# Altium PCB 2025_İDA_PCB_KARTI.PcbDoc
Units mil, origin at the board's own origin, x right, y up, seen from the top; angles counter-clockwise.
Board outline 3938.3 x 3938.3 mil, 4 copper layers (Signal_1, Power, Ground, Signal_2), stack 61.58 mil thick; 47 components, 40 nets, 228 pads, 67 vias.
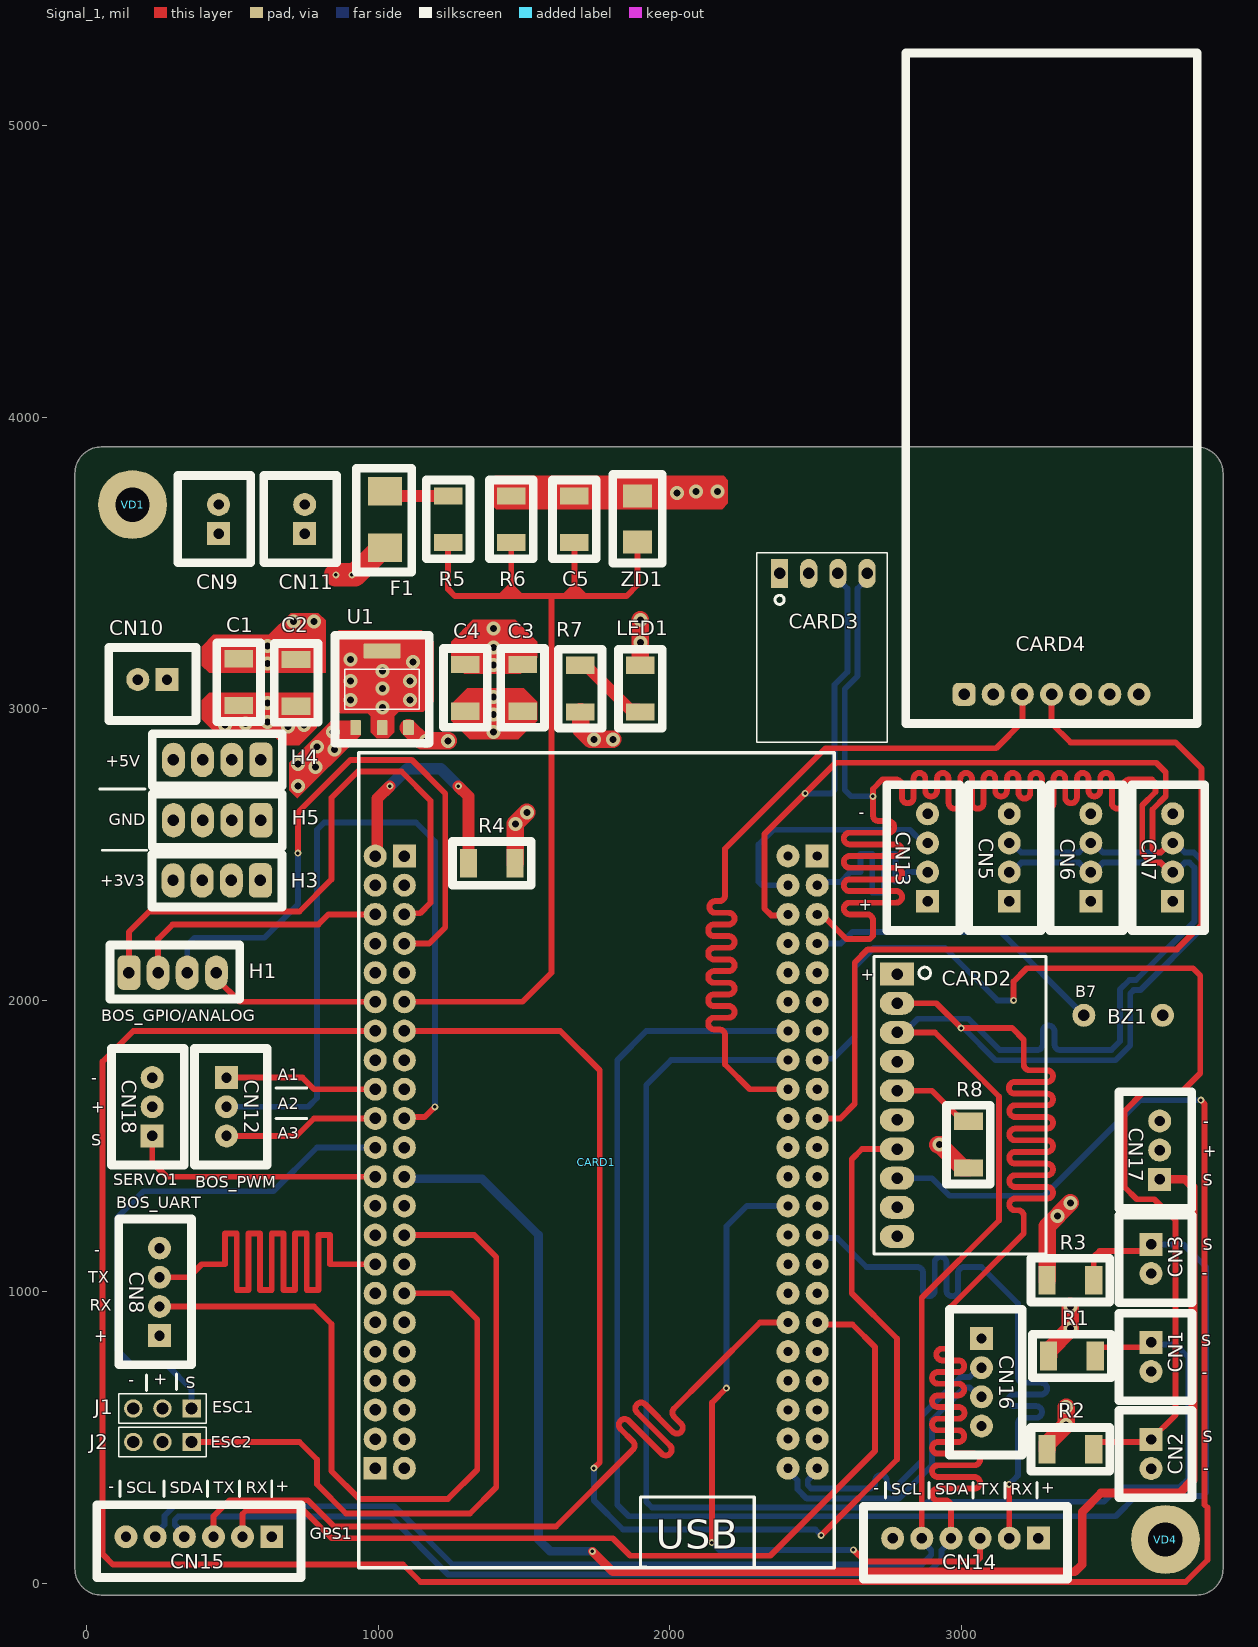
[diagram p0: Signal_1 view]
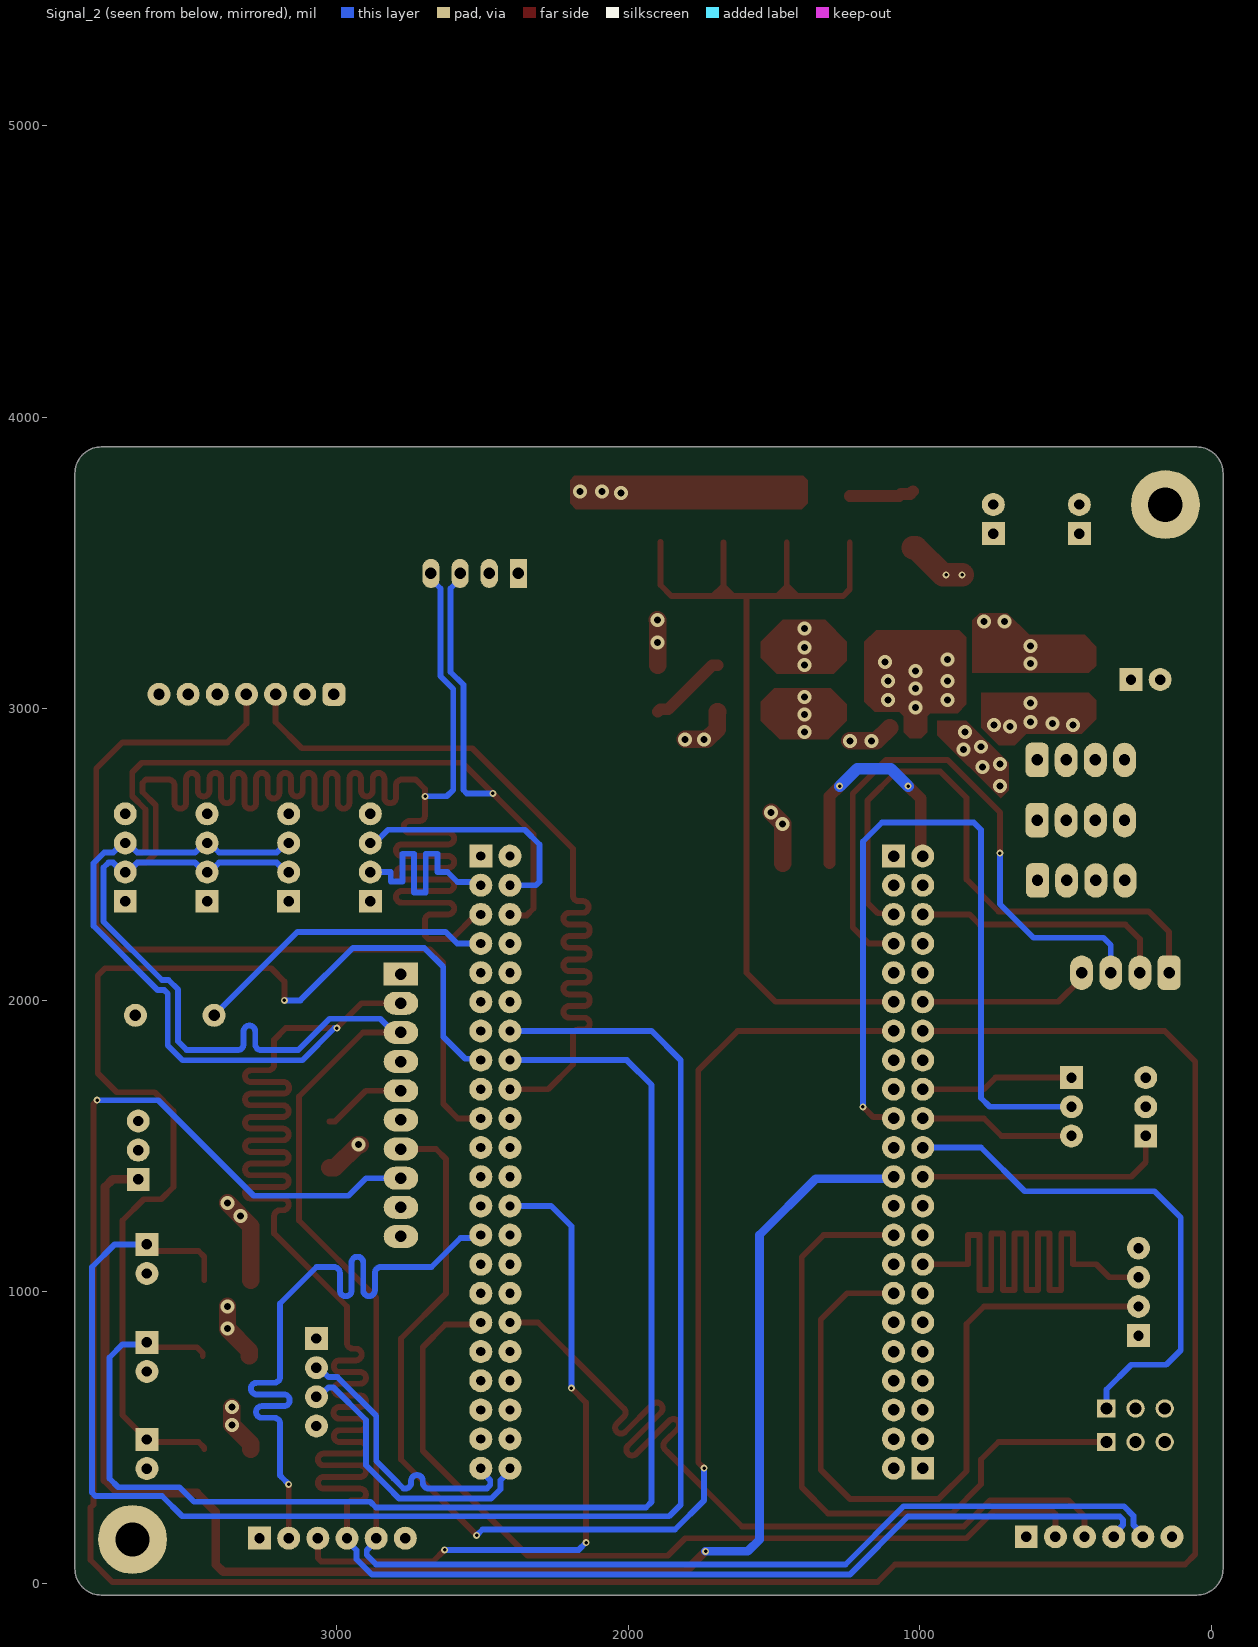
[diagram p1: Signal_2 view, seen from below]
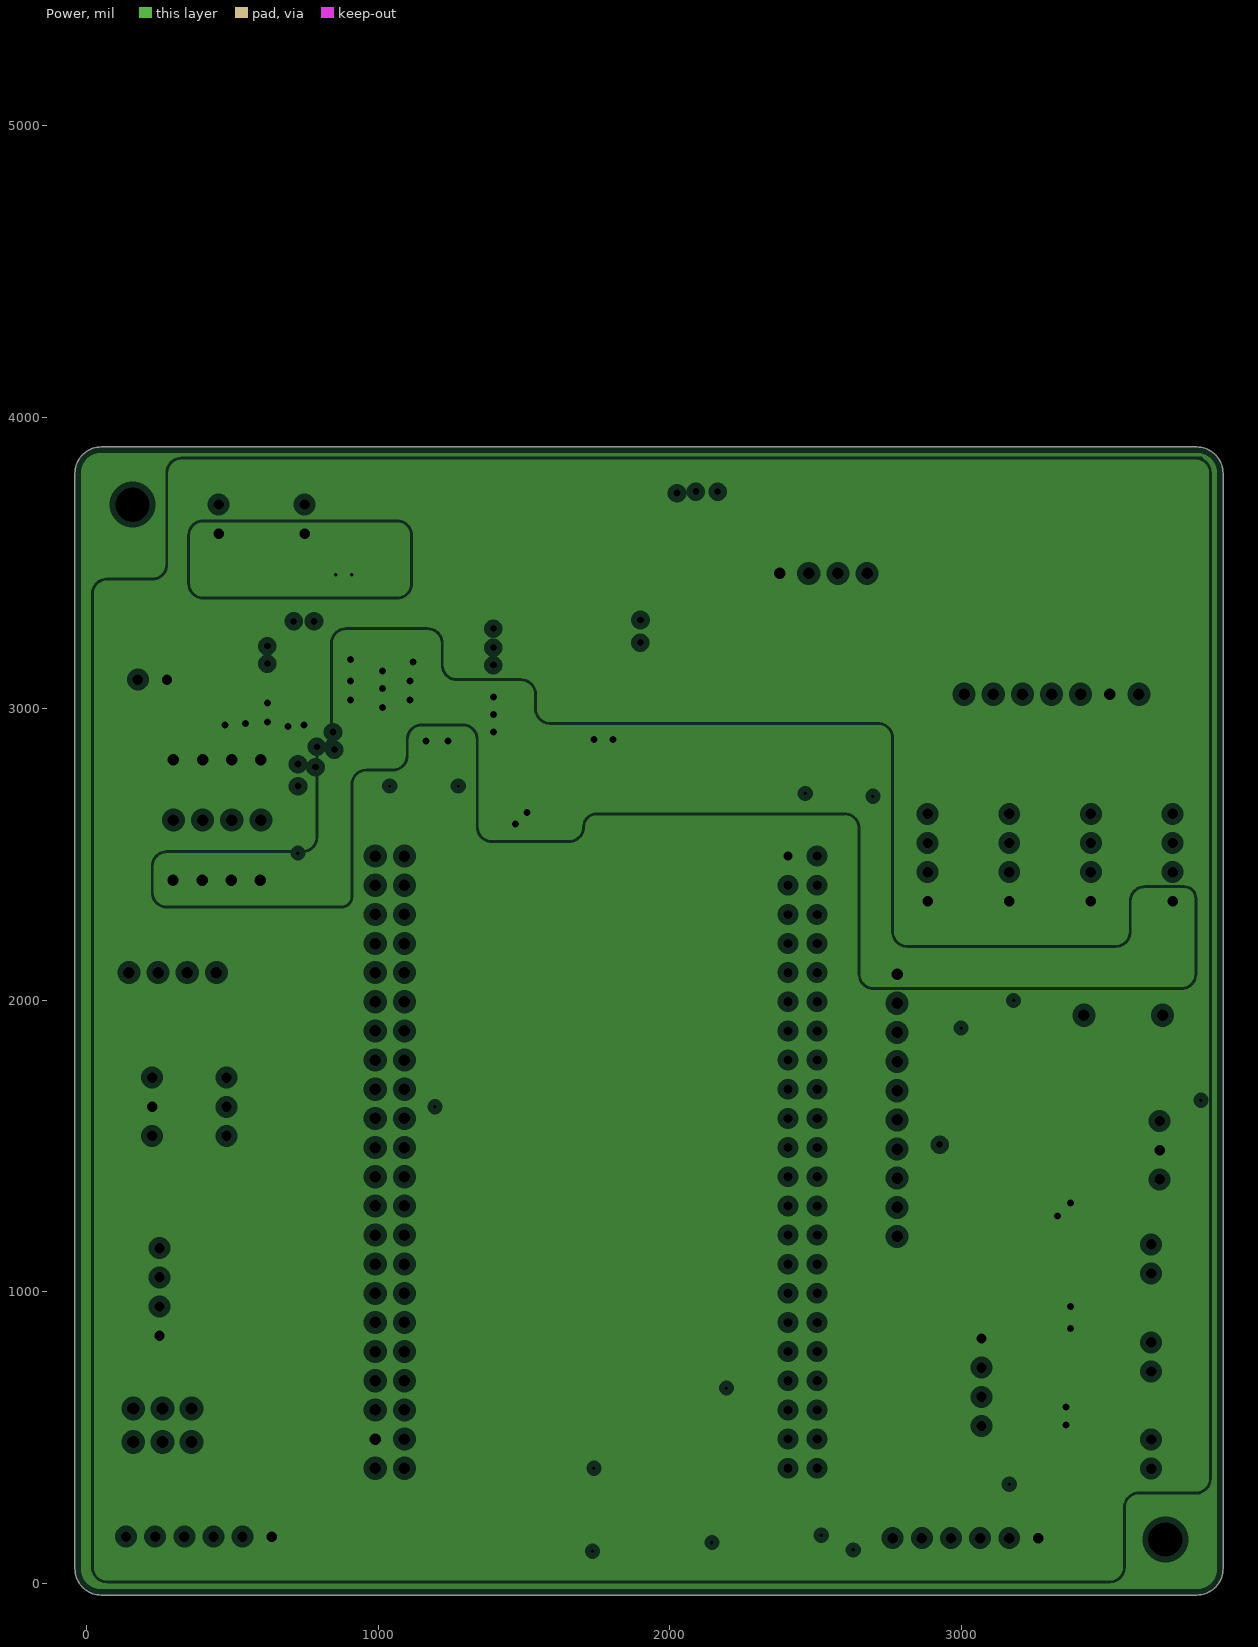
[diagram p2: Power, clearances drawn from the general rule]
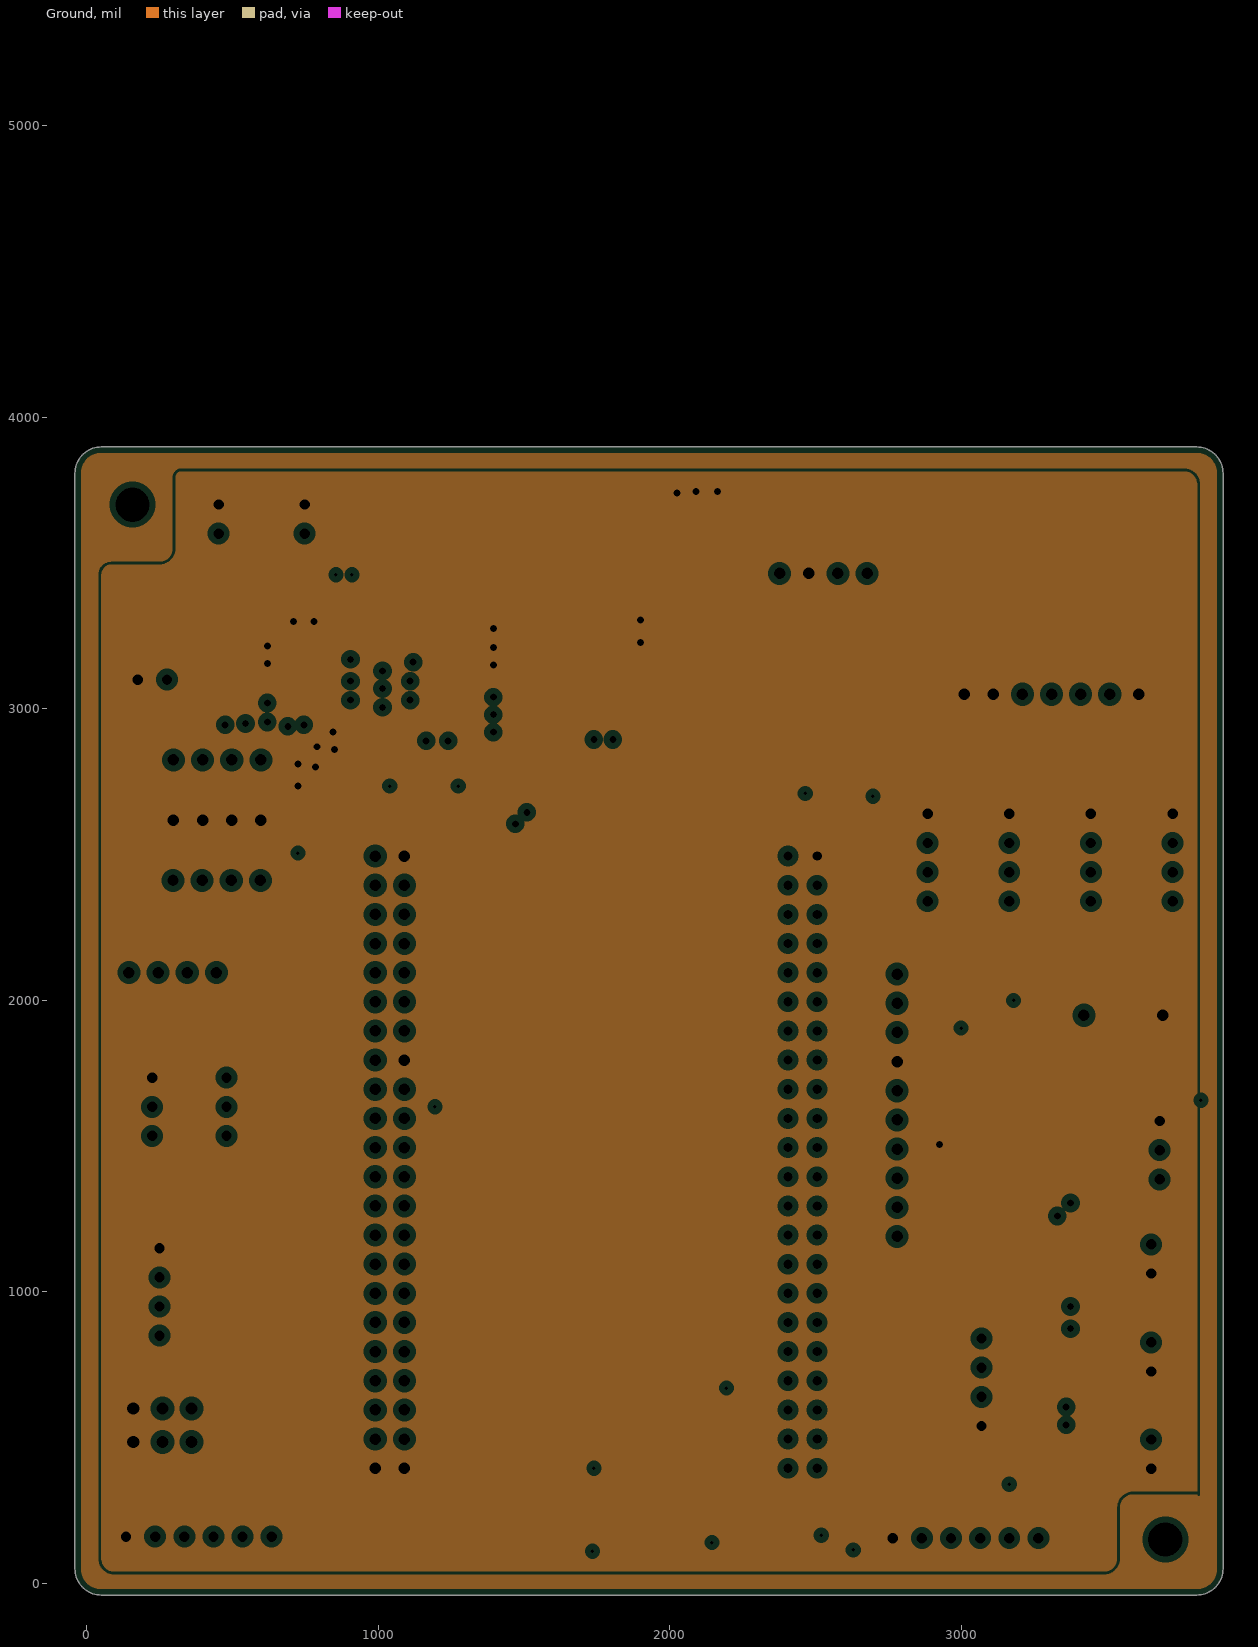
[diagram p3: Ground, clearances drawn from the general rule]
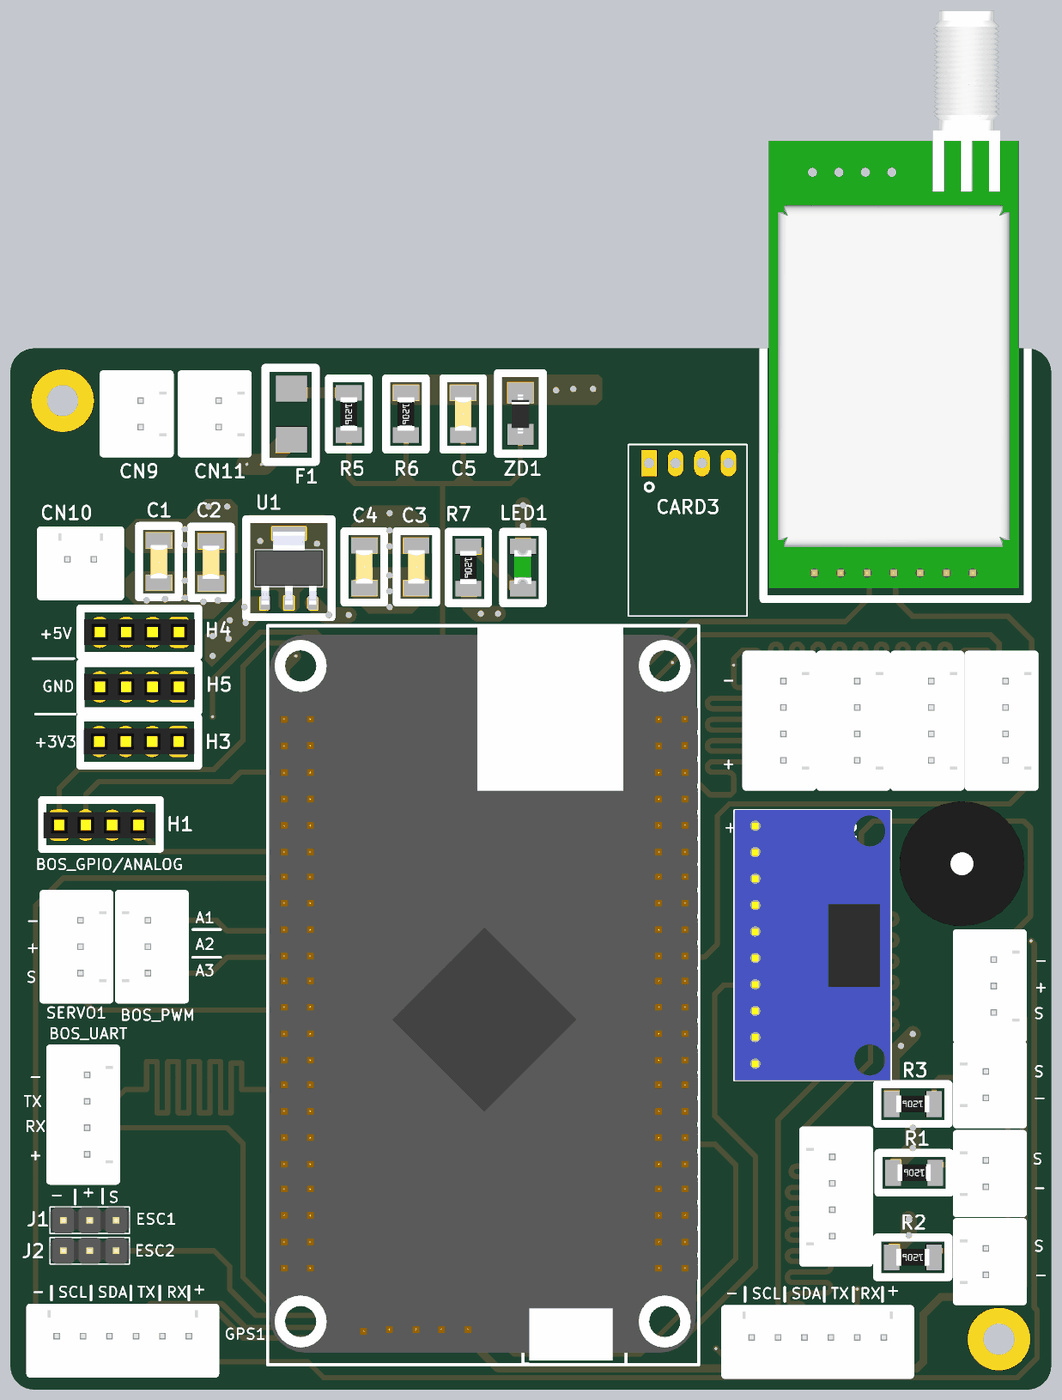
[diagram p4: 3D render of the assembled board from above, using the file's embedded part models]

## Layer stack, top to bottom
Top Solder: solder mask 0.4, Solder Resist, Dk 3.5
Signal_1: signal copper 1.38
Dielectric 2: prepreg 3.91, PP-006, Dk 4.1
Power: plane copper 0.6, net +5VDC
Dielectric 1: dielectric 49.8, FR-4, Dk 4.8
Ground: plane copper 0.6, net GND
Dielectric 3: prepreg 3.91, PP-006, Dk 4.1
Signal_2: signal copper 1.38
Bottom Solder: solder mask 0.4, Solder Resist, Dk 3.5

## Board outline
50,-40.01 cw(c50,50) -40.01,50 -40.01,3808.27 cw(c50,3808.27) 50,3898.28 3808.27,3898.28 cw(c3808.27,3808.27) 3898.28,3808.27 3898.28,50 cw(c3808.27,50) 3808.27,-40.01

## Design rules (kind name [scope] priority, off if disabled: settings)
AssemblyTestpoint [All] p1: testpointundercomponent=TRUE minsize=40 maxsize=300 preferedsize=60 minholesize=0 maxholesize=40 preferedholesize=32 testpointgrid=1 usegrid=TRUE gridtolerance=0.01 allowsidetop=TRUE allowsidebottom=TRUE
Clearance [All] p1: gap=10 ignorepadtopadclearanceinfootprint=FALSE
ComponentClearance [All] p1: gap=10 collisioncheckmode=3 verticalgap=10 showdistances=FALSE donotcheckwithout3dbody=TRUE
DiffPairsRouting [All] p1: maxlimit=20 minlimit=15 mostfreqgap=15 toplayer_minwidth=20 toplayer_maxwidth=30 toplayer_prefwidth=20 bottomlayer_minwidth=20 bottomlayer_maxwidth=30 bottomlayer_prefwidth=20 maxuncoupledlength=500
HoleSize [All] p1: absolutevalues=TRUE maxlimit=300 minlimit=1 maxpercent=80.000 minpercent=20.000
MatchedLengths [All] p1: tolerance=1000 checknetsindiffpair=TRUE checkdiffpairvsdiffpair=FALSE checkxsignals=FALSE checkothers=FALSE usedelayunits=TRUE delaytolerance=1.000000
PlaneClearance [All] p1: clearance=20
PlaneConnect [All] p1: planeconnectstyle=Direct reliefexpansion=20 reliefentries=4 reliefconductorwidth=10 reliefairgap=10
PolygonConnect [All] p1: connectstyle=Direct reliefconductorwidth=10 reliefentries=4 polygonreliefangle="90 Angle" airgapwidth=10
RoutingVias [All] p1: holewidth=12 width=24 viastyle="Through Hole" minholewidth=12 minwidth=24 maxholewidth=200 maxwidth=300
SilkToSolderMaskClearance [IsPad] p1: minsilkscreentomaskgap=6 clearancetoexposedcopper=FALSE
SolderMaskExpansion [All] p1: expansion=4 istentingtop=FALSE
Width [All] p1: maxlimit=100 minlimit=10 preferedwidth=10 minimp=50.000000 maximp=50.000000 favimp=50.000000
23 further rules are at their usual default settings.

## Classes and differential pairs
net class DIFF_BOS_UART: BOS_UART_N BOS_UART_P
net class DIFF_IMU: I2C_N I2C_P
net class DIFF_LORA: LORA_N LORA_P
net class DIFF_KUMANDA: KUMANDA_N KUMANDA_P
net class DIFF_GPS_2: GPS_2_N GPS_2_P
net class DIFF_GPS_1: GPS_1_N GPS_1_P
net class DIFF_GORUNTU: GORUNTU_N GORUNTU_P
component class STM32_Karti_Ve_Bağlantilari: CARD1 CN1 CN2 CN3 CN5 CN6 CN7 CN8 CN12 H1 R1 R2 R3 R4 VD1 VD4
component class Sensorler: CARD2 CARD3 CN14 CN15 CN16 R8
component class Kontrol_Devreleri: BZ1 CN17 CN18 J1 J2
component class Haberlesme: CARD4 CN13
component class Guc_Devreleri: C1 C2 C3 C4 C5 CN9 CN10 CN11 F1 H3 H4 H5 LED1 R5 R6 R7 U1 ZD1
differential pair BOS_UART: +BOS_UART_P -BOS_UART_N
differential pair I2C: +I2C_P -I2C_N
differential pair LORA: +LORA_P -LORA_N
differential pair KUMANDA: +KUMANDA_P -KUMANDA_N
differential pair GPS_2: +GPS_2_P -GPS_2_N
differential pair GPS_1: +GPS_1_P -GPS_1_N
differential pair GORUNTU: +GORUNTU_P -GORUNTU_N

## Components (designator, comment, footprint, x,y, rotation, side; value= is the part's Value field where it differs from the comment)
BZ1 "5V buzzer" "5v buzer" 3480.94,1948.82 r0 top
C1 "10uF" 1206_CAP 521.65,3171.81 r270 top
C2 "1uF" 1206_CAP 718.5,3169.29 r270 top
C3 "1uF" 1206_CAP 1496.06,3152.13 r270 top
C4 "10uF" 1206_CAP 1299.21,3152.13 r270 top
C5 "1uF" 1206_CAP 1673.23,3730.31 r270 top
CARD1 "STM32H723VGT6" STM32H723VGT6_GELISTIRME_KARTI 990,2495 r0 top locked
CARD2 "GY-Bno085" Bno085_Kartı 2780.79,2090 r270 top
CARD3 "AHT10_Karti" AHT10_Karti_PCB 2377.17,3464.57 r180 top
CARD4 "LORA_e22" "LORA e22" 3010,3050 r90 top
CN1 "Güvenlik Anahtarı" 2_Pin_JST_Male 3651.57,826.77 r270 top
CN2 "Güvenlik Anahtarı" 2_Pin_JST_Male 3651.57,493.7 r270 top
CN3 "Güvenlik Anahtarı" 2_Pin_JST_Male 3651.57,1162.99 r270 top
CN5 "I2C_1" 4_Pin_JST_Male 3165,2340 r90 top
CN6 "I2C_2" 4_Pin_JST_Male 3445,2340 r90 top
CN7 "I2C_3" 4_Pin_JST_Male 3725.79,2340 r90 top
CN8 "UART_7" 4_Pin_JST_Male 250,850 r90 top
CN9 "Batarya Girişi" 2_Pin_JST_Male 452.76,3600.79 r90 top
CN10 "5V Girişi" 2_Pin_JST_Male 275.59,3100.39 r180 top
CN11 "Batarya Girişi" 2_Pin_JST_Male 748.03,3600.79 r90 top
CN12 "PWM" 3_Pin_JST_Male 480,1735 r270 top
CN13 "4_Pin_JST_Male" 4_Pin_JST_Male 2885,2340 r90 top
CN14 "GPS_1" 6_Pin_JST_Male 3265,155 r180 top
CN15 "GPS_2" 6_Pin_JST_Male 635,160 r180 top
CN16 "4_Pin_JST_Male" 4_Pin_JST_Male 3070,840 r270 top
CN17 "3_Pin_JST_Male" 3_Pin_JST_Male 3681.1,1386.22 r90 top
CN18 "3_Pin_JST_Male" 3_Pin_JST_Male 225,1535 r90 top
F1 "500mA Sigorta" 1808_Sigorta 1023.62,3553.15 r90 top
H1 "GPIO/ANALOG" 4_pin_header_2.54mm_FEMALE 145,2095 r0 top
H3 "3.3V Dağıtım" 4_pin_header_2.54mm_FEMALE 596.34,2411.42 r180 top
H4 "5V Dağıtım" 4_pin_header_2.54mm_FEMALE 597.91,2824.8 r180 top
H5 "GND Dağıtım" 4_pin_header_2.54mm_FEMALE 597.91,2618.11 r180 top
J1 "ESC_1" HARWIN_M20-9990345 260,600 r180 top
J2 "ESC_2" HARWIN_M20-9990345 260,485 r180 top
LED1 "Yeşil" 1206_LED 1899.61,2989.61 r90 top
R1 "10K" 1206_RES 3460,780 r180 top
R2 "10K" 1206_RES 3455,460 r180 top
R3 "10K" 1206_RES 3455,1040 r180 top
R4 "0R" 1206_RES 1310,2470 r0 top
R5 "1M" 1206_RES 1240.16,3730.31 r270 top
R6 "200K" 1206_RES 1456.69,3730.31 r270 top
R7 "33R" 1206_RES 1692.91,3149.61 r270 top
R8 "0R" 1206_RES 3025,1425 r90 top
U1 "LDO_voltage_reg_SMD" SOT229P700X180-4N 1013.78,3067.13 r90 top value=3.3V_DC
VD1 "M3" Vida_Deliği#1 157.48,3700.79 r0 top
VD4 "M3" Vida_Deliği#2 3700.79,157.48 r0 top
ZD1 "5V1 Zener" SOD-123 1889.76,3730.31 r270 top

## Footprints (in the part's own frame and the unit in brackets; to place one, negate y for a bottom-side part, rotate by r counter-clockwise, add the part's x,y. Pads: shape width x height; smd on the part's side, far side on the other; paste and mask are expansions set on the pad)
2_Pin_JST_Male [mm]
  rect 2x2 hole 0.9 mask+0.05: 1(0,0)
  round 2 hole 0.9 mask+0.05: 2(2.54,0)
  silkscreen extent -2.54,-2.79 5.08,3.56, body extent -2.34,-2.49 4.88,3.35, height 7.21
3_Pin_JST_Male [mm]
  rect 2x2 hole 0.9 mask+0.05: 1(0,0)
  round 2 hole 0.9 mask+0.05: 2(2.54,0) 3(5.08,0)
  silkscreen extent -2.54,-2.79 7.62,3.56, body extent -2.34,-2.49 7.42,3.35, height 7.21
4_pin_header_2.54mm_FEMALE [mm]
  rrect50% 2x3 hole 1 mask+0.05: 1(0,0)
  oval 2x3 hole 1 mask+0.05: 2(2.54,0) 3(5.08,0) 4(7.62,0)
  silkscreen extent -1.65,-2.29 9.65,2.41, body extent -1.52,-1.25 9.14,1.25, height 5
4_Pin_JST_Male [mm]
  rect 2x2 hole 0.9 mask+0.05: 1(0,0)
  round 2 hole 0.9 mask+0.05: 2(2.54,0) 3(5.08,0) 4(7.62,0)
  silkscreen extent -2.54,-2.79 10.16,3.56, body extent -2.34,-2.49 9.96,3.35, height 7.21
"5v buzer" [mm]
  round 2 hole 1 mask+0.05: 1(-1.524,0) 2(5.334,0)
  body extent -3.97,-6 8.03,6, height 10
6_Pin_JST_Male [mm]
  rect 2x2 hole 0.9 mask+0.05: 1(0,0)
  round 2 hole 0.9 mask+0.05: 2(2.54,0) 3(5.08,0) 4(7.62,0) 5(10.16,0) 6(12.7,0)
  silkscreen extent -2.54,-2.79 15.24,3.56, body extent -2.34,-2.54 15.04,3.3, height 7.21
1206_CAP [mm]
  rect 1.5x2.5 smd mask+0.05: 1(0,0) 2(4.064,0)
  silkscreen extent -1.4,-1.91 5.46,1.91, body extent 0.43,-0.8 3.63,0.8, height 1.8
1206_LED [mm]
  rect 1.5x2.5 smd mask+0.05: 1(0,0) 2(4.064,0)
  silkscreen extent -1.4,-1.91 5.46,1.91, body extent 0.44,-0.8 3.71,0.85, height 0.9
1206_RES [mm]
  rect 1.5x2.5 smd mask+0.05: 1(0,0) 2(4.064,0)
  silkscreen extent -1.4,-1.91 5.46,1.91, body extent 0.43,-0.8 3.63,0.8, height 0.62
1808_Sigorta [mm]
  rect 2.5x3 smd mask+0.05: 1(0,0) 2(4.9,0)
  silkscreen extent -2.12,-2.32 6.91,2.5, body extent -0.64,-1.27 5.46,1.27, height 2.58
AHT10_Karti_PCB [mm]
  rect 1.5x2.54 hole 1 mask+0.05: 1(0,0)
  oval 1.5x2.54 hole 1 mask+0.05: 2(-2.54,0) 3(-5.08,0) 4(-7.62,0)
  silkscreen extent -9.4,-1.79 2,14.7, body extent -9.1,-1.17 1.7,14.6, height 5.1
Bno085_Kartı [mm]
  rect 2x3 hole 1: 1(0,-0.02)
  oval 2x3 hole 1: 2(2.54,-0.02) 3(5.08,-0.02) 4(7.62,-0.02) 5(10.16,-0.02) 6(12.7,-0.02) 7(15.24,-0.02) 8(17.78,-0.02) 9(20.32,-0.02) 10(22.86,-0.02)
  silkscreen extent -1.52,-2.03 24.38,12.95, body extent -1.57,-2.05 24.43,12.95, height 7.38
HARWIN_M20-9990345 [mm]
  rect 1.605x1.605 hole 1.07: 1(-2.54,0)
  round 1.605 hole 1.07: 2(0,0) 3(2.54,0)
  silkscreen extent -3.81,-1.27 3.81,1.27, body extent -3.81,-1.27 3.81,1.27, height 7.37
"LORA e22" [mm]
  rrect50% 2x2 hole 1 mask+0.05: 1(0,0)
  round 2 hole 1 mask+0.05: 2(0,-2.54) 3(0,-5.08) 4(0,-7.62) 5(0,-10.16) 6(0,-12.7) 7(0,-15.24)
  silkscreen extent -2.54,-20.32 55.88,5.08, body extent -1.52,-19.43 53.98,4.57, height 8.1
SOD-123 [mm]
  rect 2x2.5 smd mask+0.05: 1(0,0) 2(4,0)
  silkscreen extent -1.9,-2.15 5.85,2.17, body extent 0.16,-0.85 3.91,0.85, height 1.2
SOT229P700X180-4N [mm]
  rrect15% 1.31x0.93 smd: 1(-3.345,2.29) 2(-3.345,0) 3(-3.345,-2.29)
  rrect15% 1.31x3.24 smd: 2(3.345,0)
  silkscreen extent -4.7,-4.1 4.7,4.1, body extent -3.5,-3.25 3.5,3.25, height 1.8
STM32H723VGT6_GELISTIRME_KARTI [mm]
  rect 2x2 hole 0.8 mask+0.05: 1(38.508,0)
  round 2 hole 0.8 mask+0.05: 2(35.968,0) 3(38.508,-2.54) 4(35.968,-2.54) 5(38.508,-5.08) 6(35.968,-5.08) 7(38.508,-7.62) 8(35.968,-7.62) 9(38.508,-10.16) 10(35.968,-10.16) 11(38.508,-12.7) 12(35.968,-12.7) 13(38.508,-15.24) 14(35.968,-15.24) 15(38.508,-17.78) 16(35.968,-17.78) 17(38.508,-20.32) 18(35.968,-20.32) 19(38.508,-22.86) 20(35.968,-22.86) 21(38.508,-25.4) 22(35.968,-25.4) 23(38.508,-27.94) 24(35.968,-27.94) 25(38.508,-30.48) 26(35.968,-30.48) 27(38.508,-33.02) 28(35.968,-33.02) 29(38.508,-35.56) 30(35.968,-35.56) 31(38.508,-38.1) 32(35.968,-38.1) 33(38.508,-40.64) 34(35.968,-40.64) 35(38.508,-43.18) 36(35.968,-43.18) 37(38.508,-45.72) 38(35.968,-45.72) 39(38.508,-48.26) 40(35.968,-48.26) 41(38.508,-50.8) 42(35.968,-50.8) 43(38.508,-53.34) 44(35.968,-53.34)
  rect 2x2 hole 1 mask+0.05: 45(2.54,0) 88(0,-53.34)
  round 2 hole 1 mask+0.05: 46(0,0) 47(2.54,-2.54) 48(0,-2.54) 49(2.54,-5.08) 50(0,-5.08) 51(2.54,-7.62) 52(0,-7.62) 53(2.54,-10.16) 54(0,-10.16) 55(2.54,-12.7) 56(0,-12.7) 57(2.54,-15.24) 58(0,-15.24) 59(2.54,-17.78) 60(0,-17.78) 61(2.54,-20.32) 62(0,-20.32) 63(2.54,-22.86) 64(0,-22.86) 65(2.54,-25.4) 66(0,-25.4) 67(2.54,-27.94) 68(0,-27.94) 69(2.54,-30.48) 70(0,-30.48) 71(2.54,-33.02) 72(0,-33.02) 73(2.54,-35.56) 74(0,-35.56) 75(2.54,-38.1) 76(0,-38.1) 77(2.54,-40.64) 78(0,-40.64) 79(2.54,-43.18) 80(0,-43.18) 81(2.54,-45.72) 82(0,-45.72) 83(2.54,-48.26) 84(0,-48.26) 85(2.54,-50.8) 86(0,-50.8) 87(2.54,-53.34)
  silkscreen extent -1.45,-62 40,9, body extent -1.27,-61.61 39.95,9.14, height 6.34
Vida_Deliği#1 [mm]
  round 6 hole 3 mask+0.05: 1(0,0)
Vida_Deliği#2 [mm]
  round 6 hole 3 mask+0.05: 1(0,-0.178)

## Part data
BZ1: library part Buzzer
C1 C2 C3 C4 C5: library part 1206_CAP
CARD1: library part STM32H723VGT6_gelistirme_karti_sematik
CARD2: "GY-BNO080 BNO085 9-Axis High Precision Acceleration and Gyro Sensor", ComponentLink1Description="Ürün Linki", ComponentLink1URL=https://www.motorobit.com/gy-bno080-bno085-9-eksen-yuksek-hassasiyetli-ivme-ve-gyro-sensoru
CARD3: "Temperature and humidity sensor Fully calibrated / • Digital output, I2C interface / • Excellent long-term stability / • SMD package reflow solderable / • Fast response and strong anti-interference ability", ComponentLink1Description="Product Datasheet", ComponentLink1URL=https://robu.in/wp-content/uploads/2021/01/AHT10.pdf, ComponentLink2Description="Product Datasheet 2", ComponentLink2URL=https://esphome.io/components/sensor/aht10.html
CN1 CN2 CN3 CN9 CN10 CN11: library part 2_Pin_JST_Male
CN5 CN6 CN7 CN8: library part 4_Pin_JST_Male
CN12: library part 3_Pin_JST_Male
CN14 CN15: library part 6_Pin_JST_Male
F1: library part 1808_Sigorta
H1 H3 H4 H5: library part 4_pin_header_female
J1 J2: library part M20-9990345, "2.54mm (0.1) Pitch SIL Vertical Throughboard Pin Header, 6.1mm mating pin height, gold (hi-temp mould), 3 contacts", Package=None, Check_prices=https://www.snapeda.com/parts/M20-9990345/Harwin+Inc./view-part/?ref=eda, MF=Harwin, MP=M20-9990345, SnapEDA_Link=https://www.snapeda.com/parts/M20-9990345/Harwin+Inc./view-part/?ref=snap
LED1: library part 1206_LED
R1 R2 R3 R4 R5 R6 R7 R8: library part 1206_RES
U1: library part AMS1117-3.3, "Sot223/Pkg 1-Amp 3.3-Volt Low Drop Out Voltage Regulatator", LCSC Part Number=C20611856, Package="SOT-223 Seeed Technology", Availability="Not in stock", Check_prices=https://www.snapeda.com/parts/AMS1117-3.3/Advanced+Monolithic+Systems/view-part/?ref=eda, MF="Advanced Monolithic Systems", MP=AMS1117-3.3, Price=None, SnapEDA_Link=https://www.snapeda.com/parts/AMS1117-3.3/Advanced+Monolithic+Systems/view-part/?ref=snap
VD1 VD4: library part Vida_Deliği
ZD1: library part SMD_Zener_Diyot

## Via types
v1: diameter 48, hole 24, Signal_1 to Signal_2, tented both sides, 49 vias
v2: diameter 24, hole 12, Signal_1 to Signal_2, tented both sides, 18 vias

## Nets (pads, with @x,y where several pads share a name; then routed paths per layer and width w, separated by ;. In a path a pad name is that pad's centre, name@x,y a point inside that pad or via, vN(x,y) a via of type N, cw(c..) or ccw(c..) an arc to the next point about the centre after c; other vN are vias at no path point)
+3V3DC: C3.2 C4.2 CARD2.1 CN7.1 H3.1 H3.2 H3.3 H3.4 R4.2 R7.2 U1.2 | length 377.4
  Signal_1 w60: R4.2 1470.47,2470.47 v1(1470.47,2605.47) v1(1510,2645) ; R7.2 1694.53,2989.61 1695,2989.13 1695,2930.15 1730.15,2895 v1(1805,2895)
  other v1: 1740,2895 1395,2920 1395,2980 1015,3005 905,3030 1110,3030 1395,3040 1015,3070 905,3095 1110,3095 1015,3130 1120,3160 905,3170
+5VDC: C1.2 C2.2 CARD1.2 CARD1.86 CARD3.1 CARD4.6 CN5.1 CN6.1 CN8.1 CN10.1 CN13.1 CN14.1 CN15.1 CN16.1 CN17.2 CN18.2 H4.1 H4.2 H4.3 H4.4 R1.2 R2.2 R3.2 U1.3 | length 826
  Signal_1 w60: U1.3 1149.37,2890 v1(1240,2890) ; R2.2 3295,478.74 v1(3360,543.74) v1(3360,605) ; R3.2 3295,1225 v1(3375,1305) ; R1.2 3300,798.74 v1(3375,873.74) v1(3375,950)
  other v1: 3330,1260 1165,2890 690,2940 475,2945 745,2945 545,2950 620,2955 620,3020
+Vbat: CN9.1 CN11.1 F1.1 | length 207.2
  Signal_1 w80: v2(855,3460) 920.63,3460 1013.78,3553.15 F1.1
  other v2: 910,3460
A1_PWM: CARD1.62 CN12.1 | length 526.6
  Signal_1 w20: CN12.1 740,1735 780,1695 CARD1.62
A2_PWM: CARD1.63 CN12.2 | length 2716.3
  Signal_1 w20: CARD1.63 1094.37,1599.37 1159.37,1599.37 v2(1195,1635)
  Signal_2 w20: CN12.2 760,1635 790,1665 790,2585 815,2610 1130,2610 1195,2545 v2(1195,1635)
A3_PWM: CARD1.64 CN12.3 | length 534.9
  Signal_1 w20: CN12.3 720,1535 780,1595 CARD1.64
A5_PWM: CARD1.66 J1.1 | length 1815.3
  Signal_2 w20: J1.1 360,665 275,750 155,750 105,800 105,1255 195,1345 640,1345 790,1495 CARD1.66
A6_PWM: CARD1.67 CN17.1 | length 5244.1
  Signal_1 w30: v2(1735,110) 1805,40 3390,40 3415,65 3415,245 3480,310 3750,310 3795,355 3795,1360 3768.78,1386.22 CN17.1
  Signal_2 w30: CARD1.67 1096.55,1388.45 1356.55,1388.45 1550,1195 1550,150 1590,110 v2(1735,110)
A7_PWM: CARD1.68 CN18.1 | length 875.7
  Signal_1 w20: CN18.1 225,1445 275,1395 CARD1.68
B0_PWM: CARD1.71 J2.1 | length 2369.6
  Signal_1 w20: J2.1 730,485 790,425 790,340 890,240 1315,240 1405,330 1405,1120 1330,1195 CARD1.71
B7_PWM: BZ1.1 CARD1.7 | length 1050
  Signal_2 w20: CARD1.7 2587.15,2195 2627.15,2235 3134.76,2235 BZ1.1
BOS_UART_N: CARD1.74 CN8.3 | length 2506.6
  Signal_1 w20: CN8.3 350,1050 395,1095 465,1095 475,1095 475,1200 515,1200 515,1006.4 555,1006.4 555,1200 595,1200 595,1006.4 635,1006.4 635,1200 675,1200 675,1006.4 715,1006.4 715,1200 755,1200 755,1006.4 795,1006.4 795,1194.58 835,1194.58 835,1095 871.85,1095 CARD1.74
BOS_UART_P: CARD1.75 CN8.2 | length 2502.9
  Signal_1 w20: CN8.2 780,950 840,890 840,385 935,290 1240,290 1340,390 1340,905 1250,995 CARD1.75
C0_ANALOG: C5.2 CARD1.55 R5.2 R6.2 ZD1.2 | length 3171.8
  Signal_1 w20: CARD1.55 1495,1995 1595,2095 1595,3385 1593.31,3386.69 ; R5.2 1240.16,3410.12 1263.59,3386.69 1456.69,3386.69 ; R6.2 1456.69,3386.69 ; C5.2 1673.23,3406.77 1675,3405 ; ZD1.2 1889.76,3424.76 1851.69,3386.69 1675,3386.69 1593.31,3386.69 ; 1456.69,3386.69 1593.31,3386.69
C1_ANALOG: CARD1.56 H1.4 | length 598
  Signal_1 w20: H1.4 445,2075.32 525.32,1995 CARD1.56
C2_INT: CARD1.57 CARD2.7 | length 4670.3
  Signal_1 w20: CARD1.57 1625,1895 1760,1760 1760,415 v2(1740,395) ; v2(2520,165) 2780,425 2780,840 2625,995 2625,1455 2660,1490 CARD2.7
  Signal_2 w20: v2(1740,395) 1740,285 1840,185 2500,185 v2(2520,165)
C3_GPIO: CARD1.58 CARD2.8 | length 9318.7
  Signal_1 w20: CARD1.58 160,1895 55,1790 55,100 90,65 1085,65 1145,5 3770,5 3845,80 3845,260 3835,270 3835,1645 v2(3822.5,1657.5)
  Signal_2 w20: CARD2.8 2900,1390 2960,1330 3285,1330 3612.5,1657.5 v2(3822.5,1657.5)
D3_GPIO: CARD1.16 CN1.1 R1.1 | length 4642.4
  Signal_1 w20: R1.1 3460,790.47 3479.53,810 3634.8,810 CN1.1
  Signal_2 w20: CARD1.16 2005,1795 1920,1710 1920,280 1939.37,260.63 2865.63,260.63 2885,280 3490,280 3540,330 3750,330 3780,360 3780,775 3735,820 3658.35,820 CN1.1
D4_GPIO: CARD1.15 CN2.1 R2.1 | length 3913.6
  Signal_1 w20: v2(3180,2000) 3180,2065 3225,2110 3795,2110 3820,2085 3820,1750 3755,1685 3625,1685 3560,1620 3560,1360 3602.5,1317.5 3662.5,1317.5 3735,1245 3735,577.13 CN2.1 3642.87,485 3474.53,485 3455,465.47 R2.1
  Signal_2 w20: CARD1.15 2510.65,1799.58 2559.58,1799.58 2635,1875 2635,2115 2700,2180 2945,2180 3125,2000 v2(3180,2000)
D5_GPIO: CARD1.14 CN3.1 R3.1 | length 5511.6
  Signal_1 w20: R3.1 3455,1120.47 3474.53,1140 3628.58,1140 CN3.1
  Signal_2 w20: CARD1.14 1920,1895 1820,1795 1820,270 1860,230 3530,230 3600,300 3828.28,300 3840,311.72 3840,1085 3762.01,1162.99 CN3.1
E4_GPIO: CARD1.49 H1.1 | length 2064.8
  Signal_1 w20: H1.1 145,2235 215,2305 730,2305 840,2415 840,2695 930,2785 1080,2785 1180,2685 1180,2335 1144.05,2299.05 1094.05,2299.05 CARD1.49
E5_GPIO: CARD1.50 H1.2 | length 895.2
  Signal_1 w20: H1.2 245,2210 295,2260 795,2260 830,2295 CARD1.50
E6_GPIO: CARD1.51 H1.3 | length 2098
  Signal_1 w20: v2(725,2505) 725,2645 905,2825 1115,2825 1230,2710 1230,2250 1175,2195 CARD1.51
  Signal_2 w20: H1.3 345,2190 370,2215 610,2215 725,2330 v2(725,2505)
GND: BZ1.2 C1.1 C2.1 C3.1 C4.1 C5.1 CARD1.1 CARD1.45 CARD1.59 CARD1.87 CARD1.88 CARD2.4 CARD3.2 CARD4.1 CARD4.2 CARD4.7 CN1.2 CN2.2 CN3.2 CN5.4 CN6.4 CN7.4 CN8.4 CN9.2 CN10.2 CN11.2 CN13.4 CN14.6 CN15.6 CN16.4 CN17.3 CN18.3 H5.1 H5.2 H5.3 H5.4 J1.3 J2.3 LED1.2 R6.1 R8.1 U1.1 ZD1.1 | length 293.7
  Signal_1 w60: LED1.2 1899.61,3304.61 v1(1900,3305) ; v1@2920,1505 v1(2926.26,1505) 3006.26,1425 R8.1
  other v1: 725,2735 785,2800 725,2810 850,2860 790,2870 845,2920 1395,3150 620,3155 1395,3210 620,3215 1899.61,3227.11 1395,3275 710,3300 780,3300 2025,3740 2090,3745 2165,3745
GORUNTU_N: CARD1.44 CN16.3 | length 992.9
  Signal_2 w20: CARD1.44 2406.06,386.41 2438.56,353.91 2438.56,322.85 2470.78,290.63 2785.63,290.63 2829.75,334.75 2900,405 2900,560.15 3012.35,672.5 3028.91,672.5 3061.41,640 CN16.3
GORUNTU_P: CARD1.43 CN16.2 | length 992.9
  Signal_2 w20: CARD1.43 2506.06,386.41 2473.56,353.91 2473.56,337.35 2485.28,325.63 2616.64,325.63 2685,325.63 ccw(c2685,345.63) 2705,345.63 2705,351.79 cw(c2725,351.79) 2745,351.79 2745,345.63 ccw(c2765,345.63) 2765,325.63 2771.13,325.63 2805,359.5 2865,419.5 2865,574.65 2997.85,707.5 3028.91,707.5 3061.41,740 CN16.2
GPS_1_N: CARD1.26 CN14.3 | length 2364.7
  Signal_1 w20: v2(2145,140) 2145,620 v2(2195,670) ; v2(2630,115) 2670,75 3053.28,75 3065,86.72 CN14.3
  Signal_2 w20: v2(2145,140) 2170,115 v2@2628.92,115 ; v2(2195,670) 2195,1225 2265,1295 CARD1.26
GPS_1_P: CARD1.27 CN14.2 | length 2368.8
  Signal_1 w20: CN14.2 v2(3165,340)
  Signal_2 w20: CARD1.27 2516.5,1184.57 2575.43,1184.57 2675,1085 2799.4,1085 2849.41,1085 cw(c2849.41,1065) 2869.41,1065 2869.41,1005 ccw(c2889.41,1005) 2909.41,1005 2909.41,1100.78 cw(c2929.41,1100.78) 2949.41,1100.78 2949.41,1005 ccw(c2969.41,1005) 2989.41,1005 2989.41,1065 cw(c3009.41,1065) 3009.41,1085 3050,1085 3070,1085 3195,960 3195,718.13 3195,708.13 ccw(c3215,708.13) 3215,688.13 3275,688.13 cw(c3275,668.13) 3275,648.13 3181.74,648.13 ccw(c3181.74,628.13) 3181.74,608.13 3257.16,608.13 cw(c3257.16,588.13) 3257.16,568.13 3215,568.13 ccw(c3215,548.13) 3195,548.13 3195,370 3189.67,364.67 v2(3165,340)
GPS_2_N: CARD1.34 CN15.3 | length 3053.3
  Signal_1 w20: CN15.3 435,230 490,285 759.5,285 849.5,195 1610,195 1866.78,451.78 1873.85,458.85 ccw(c1859.71,472.99) 1873.85,487.14 1831.43,529.56 cw(c1845.57,543.7) 1831.43,557.85 cw(c1845.57,543.7) 1859.71,557.85 1972.85,444.71 ccw(c1986.99,458.85) 2001.13,444.71 ccw(c1986.99,458.85) 2001.13,472.99 1887.99,586.13 cw(c1902.14,600.27) 1887.99,614.42 cw(c1902.14,600.27) 1916.28,614.42 2011.06,519.64 ccw(c2025.2,533.78) 2039.34,519.64 ccw(c2025.2,533.78) 2039.34,547.92 2015.27,571.99 cw(c2029.42,586.13) 2015.27,600.27 2125.58,710.58 2310,895 CARD1.34
GPS_2_P: CARD1.33 CN15.2 | length 3055.6
  Signal_1 w20: CN15.2 535,238.28 546.72,250 745,250 840,155 1805,155 1865,95 2345,95 2705,455 2705,810 2627.08,887.92 2513.15,887.92 CARD1.33
I2C_N: CARD1.5 CARD2.3 CARD3.4 CN5.2 CN6.2 CN7.2 CN14.5 CN15.5 | length 13414.7
  Signal_1 w20: CARD1.5 2521.96,2295 2606.96,2210 2685.62,2210 2697.34,2221.72 2697.34,2265 2697.34,2275 ccw(c2677.34,2275) 2677.34,2295 2617.34,2295 cw(c2617.34,2315) 2617.34,2335 2777.34,2335 ccw(c2777.34,2355) 2777.34,2375 2617.34,2375 cw(c2617.34,2395) 2617.34,2415 2777.34,2415 ccw(c2777.34,2435) 2777.34,2455 2617.34,2455 cw(c2617.34,2475) 2617.34,2495 2777.34,2495 ccw(c2777.34,2515) 2777.34,2535 2617.34,2535 cw(c2617.34,2555) 2617.34,2575 2750.66,2575 ccw(c2750.66,2595) 2750.66,2615 2717.34,2615 cw(c2717.34,2635) 2697.34,2635 v2(2697.34,2700) 2697.34,2725 2726.96,2754.63 2729.67,2757.34 2776.96,2757.34 cw(c2776.96,2737.34) 2796.96,2737.34 2796.96,2695.92 ccw(c2816.96,2695.92) 2836.96,2695.92 2836.96,2760 cw(c2856.96,2760) 2876.96,2760 2876.96,2719.37 ccw(c2896.96,2719.37) 2916.96,2719.37 2916.96,2760 cw(c2936.96,2760) 2956.96,2760 2956.96,2677.34 ccw(c2976.96,2677.34) 2996.96,2677.34 2996.96,2760 cw(c3016.96,2760) 3036.96,2760 3036.96,2677.34 ccw(c3056.96,2677.34) 3076.96,2677.34 3076.96,2760 cw(c3096.96,2760) 3116.96,2760 3116.96,2719.37 ccw(c3136.96,2719.37) 3156.96,2719.37 3156.96,2760 cw(c3176.96,2760) 3196.96,2760 3196.96,2712 ccw(c3216.96,2712) 3236.96,2712 3236.96,2760 cw(c3256.96,2760) 3276.96,2760 3276.96,2677.34 ccw(c3296.96,2677.34) 3316.96,2677.34 3316.96,2760 cw(c3336.96,2760) 3356.96,2760 3356.96,2695.92 ccw(c3376.96,2695.92) 3396.96,2695.92 3396.96,2760 cw(c3416.96,2760) 3436.96,2760 3436.96,2719.37 ccw(c3456.96,2719.37) 3476.96,2719.37 3476.96,2760 cw(c3496.96,2760) 3516.96,2760 3516.96,2677.34 ccw(c3536.96,2677.34) 3556.96,2677.34 3556.96,2737.34 cw(c3576.96,2737.34) 3576.96,2757.34 3615,2757.34 3655,2757.34 3666.72,2745.62 3666.72,2714.39 3621.42,2669.09 3621.42,2504.72 3653.64,2472.5 3684.7,2472.5 3717.2,2440 CN7.2 ; CARD2.3 2910,1890 3130,1670 3130,1245 2865,980 CN14.5
  Signal_2 w20: CN15.5 235,168.59 267.5,201.09 267.5,232.15 299.72,264.37 1055.63,264.37 1255,65 2865.15,65 2897.5,97.35 2897.5,113.91 2865,146.41 CN14.5 ; CARD3.4 2677.17,3445.35 2644.67,3412.85 2644.67,3112.25 2600.74,3068.32 2600.74,2721.72 2622.46,2700 v2(2697.34,2700) ; CARD2.3 2803.79,1890 2850.79,1937 3025.25,1937 3132.5,1829.75 3250,1829.75 3260,1829.75 ccw(c3260,1849.75) 3280,1849.75 3280,1893.4 cw(c3300,1893.4) 3320,1893.4 3320,1849.75 ccw(c3340,1849.75) 3340,1829.75 3390,1829.75 3515.25,1829.75 3545,1859.5 3545,2037.78 3577.22,2070 3600,2070 3800,2270 3800,2455.94 3783.44,2472.5 3766.87,2472.5 3734.37,2440 CN7.2 3717.2,2440 3684.7,2472.5 3486.09,2472.5 3453.59,2440 CN6.2 3436.41,2440 3403.91,2472.5 3206.09,2472.5 3173.59,2440 CN5.2
I2C_P: CARD1.6 CARD2.2 CARD3.3 CN5.3 CN6.3 CN7.3 CN14.4 CN15.4 | length 13414.7
  Signal_1 w20: CARD1.6 2402.65,2291.59 2348.41,2291.59 2325,2315 2325,2569.95 2570.05,2815 3669.5,2815 3701.72,2782.78 3701.72,2699.89 3656.42,2654.59 3656.42,2519.22 3668.13,2507.5 3684.7,2507.5 3717.2,2540 CN7.3 ; CARD2.2 2915,1990 v2(3000,1905) 3175,1905 3215,1865 3215,1850 3215,1780 ccw(c3235,1780) 3235,1760 3295,1760 cw(c3295,1740) 3295,1720 3183.54,1720 ccw(c3183.54,1700) 3183.54,1680 3295,1680 cw(c3295,1660) 3295,1640 3185,1640 ccw(c3185,1620) 3185,1600 3295,1600 cw(c3295,1580) 3295,1560 3185,1560 ccw(c3185,1540) 3185,1520 3295,1520 cw(c3295,1500) 3295,1480 3185,1480 ccw(c3185,1460) 3185,1440 3295,1440 cw(c3295,1420) 3295,1400 3185,1400 ccw(c3185,1380) 3185,1360 3295,1360 cw(c3295,1340) 3295,1320 3185,1320 ccw(c3185,1300) 3185,1280 3195,1280 cw(c3195,1260) 3215,1260 3215,1250 3215,1200 2965,950 2965,869.12 2965,825 cw(c2945,825) 2945,805 2934.62,805 ccw(c2934.62,785) 2934.62,765 2990.63,765 cw(c2990.63,745) 2990.63,725 2920,725 ccw(c2920,705) 2920,685 2990.63,685 cw(c2990.63,665) 2990.63,645 2920,645 ccw(c2920,625) 2920,605 2991.04,605 cw(c2991.04,585) 2991.04,565 2920,565 ccw(c2920,545) 2920,525 2990.63,525 cw(c2990.63,505) 2990.63,485 2920,485 ccw(c2920,465) 2920,445 3045,445 cw(c3045,425) 3045,405 2920,405 ccw(c2920,385) 2920,365 3045,365 cw(c3045,345) 3045,325 2920,325 ccw(c2920,305) 2920,285 2945,285 cw(c2945,265) 2965,265 2965,255 CN14.4
  Signal_2 w20: CN15.4 335,168.59 302.5,201.09 302.5,217.65 314.22,229.37 1041.13,229.37 1240.5,30 2879.65,30 2932.5,82.85 2932.5,113.91 2965,146.41 CN14.4 ; v2(2465,2710) 2554.02,2710 2565.74,2721.72 2565.74,3082.82 2609.67,3126.75 2609.67,3412.85 2577.17,3445.35 CARD3.3 ; v2(3000,1905) 3007.75,1905 3118,1794.75 3529.75,1794.75 3580,1845 3580,2023.28 3591.72,2035 3614.5,2035 3835,2255.5 3835,2470.44 3797.94,2507.5 3766.87,2507.5 3734.37,2540 CN7.3 3717.2,2540 3684.7,2507.5 3486.09,2507.5 3453.59,2540 CN6.3 3436.41,2540 3403.91,2507.5 3206.09,2507.5 3173.59,2540 CN5.3
KUMANDA_N: CARD1.4 CN13.3 | length 853.6
  Signal_2 w20: CARD1.4 2316.72,2395 2305,2406.72 2305,2535 2355,2585 2824.11,2585 2869.11,2540 CN13.3
KUMANDA_P: CARD1.3 CN13.2 | length 853.6
  Signal_2 w20: CARD1.3 2517.3,2406.24 2586.24,2406.24 2620,2440 2645,2440 2655,2440 2655,2502.73 2695,2502.73 2695,2369.89 2735,2369.89 2735,2502.73 2775,2502.73 2775,2407.59 2815,2407.59 2815,2440 2874.92,2440 CN13.2
LORA_N: CARD1.19 CARD4.4 | length 3092.7
  Signal_1 w20: CARD1.19 2585,1595 2635,1645 2635,2130 2680,2175 3740,2175 3825,2260 3825,2795 3735,2885 3375,2885 3310,2950 CARD4.4
LORA_P: CARD1.18 CARD4.3 | length 3092.7
  Signal_1 w20: CARD1.18 2275,1695 2190,1780 2190,1870.4 2190,1880.41 ccw(c2170,1880.41) 2170,1900.41 2152.17,1900.41 cw(c2152.17,1920.41) 2152.17,1940.41 2202.65,1940.41 ccw(c2202.65,1960.41) 2202.65,1980.41 2152.17,1980.41 cw(c2152.17,2000.41) 2152.17,2020.41 2202.65,2020.41 ccw(c2202.65,2040.41) 2202.65,2060.41 2152.17,2060.41 cw(c2152.17,2080.41) 2152.17,2100.41 2202.65,2100.41 ccw(c2202.65,2120.41) 2202.65,2140.41 2152.17,2140.41 cw(c2152.17,2160.41) 2152.17,2180.41 2202.65,2180.41 ccw(c2202.65,2200.41) 2202.65,2220.41 2152.17,2220.41 cw(c2152.17,2240.41) 2152.17,2260.41 2202.65,2260.41 ccw(c2202.65,2280.41) 2202.65,2300.41 2156.26,2300.41 cw(c2156.26,2320.41) 2156.26,2340.41 2170,2340.41 ccw(c2170,2360.41) 2190,2360.41 2190,2405.3 2190,2520 2535,2865 3120,2865 3210,2955 CARD4.3
NetCARD1_46: CARD1.46 R4.1 | length 824.9
  Signal_1 w40: CARD1.46 997.41,2502.41 997.41,2692.41 v2(1040,2735) ; v2(1275,2735) 1310,2700 R4.1
  Signal_2 w40: v2(1040,2735) 1100,2795 1215,2795 v2(1275,2735)
NetCARD2_5: CARD2.5 R8.2 | length 328.5
  Signal_1 w20: CARD2.5@2740,1690 2900.32,1690 3005.32,1585 R8.2
NetF1_2: F1.2 R5.1 | length 223.1
  Signal_1 w40: F1.2 1032.83,3736.85 1064.41,3736.85 1070.94,3730.31 R5.1
NetLED1_1: LED1.1 R7.1 | length 273
  Signal_1 w40: R7.1 1712.6,3149.61 1863.07,2999.13 1890.08,2999.13 LED1.1
pads on no net: CARD1.8 CARD1.9 CARD1.10 CARD1.11 CARD1.12 CARD1.13 CARD1.17 CARD1.20 CARD1.21 CARD1.22 CARD1.23 CARD1.24 CARD1.25 CARD1.28 CARD1.29 CARD1.30 CARD1.31 CARD1.32 CARD1.35 CARD1.36 CARD1.37 CARD1.38 CARD1.39 CARD1.40 CARD1.41 CARD1.42 CARD1.47 CARD1.48 CARD1.52 CARD1.53 CARD1.54 CARD1.60 CARD1.61 CARD1.65 CARD1.69 CARD1.70 CARD1.72 CARD1.73 CARD1.76 CARD1.77 CARD1.78 CARD1.79 CARD1.80 CARD1.81 CARD1.82 CARD1.83 CARD1.84 CARD1.85 CARD2.6 CARD2.9 CARD2.10 CARD4.5 J1.2 J2.2 VD1.1 VD4.1

## Polygon pours and split planes (outlines as drawn)
+5VDC on Power (split plane): 3815.13,3877.93 3821.92,3876.92 3828.59,3875.25 3835.06,3872.94 3841.27,3870 3847.16,3866.47 3852.67,3862.38 3857.76,3857.76 3862.38,3852.67 3866.47,3847.16 3870,3841.27 3872.94,3835.06 3875.25,3828.59 3876.92,3821.92 3877.93,3815.13 3878.24,3808.82 3878.19,3808.27 3878.19,50 3878.24,49.45 3877.93,43.14 3876.92,36.34 3875.25,29.68 3872.94,23.21 3870,17 3866.47,11.11 3862.38,5.59 3857.76,0.5 3852.67,-4.11 3847.16,-8.2 3841.27,-11.73 3835.06,-14.67 3828.59,-16.99 3821.92,-18.65 3815.13,-19.66 3808.82,-19.97 3808.27,-19.92 50,-19.92 49.45,-19.97 43.14,-19.66 36.34,-18.65 29.68,-16.99 23.21,-14.67 17,-11.73 11.11,-8.2 5.59,-4.11 0.5,0.5 -4.11,5.59 -8.2,11.11 -11.73,17 -14.67,23.21 -16.99,29.68 -18.65,36.34 -19.66,43.14 -19.97,49.45 -19.92,50 -19.92,3808.27 -19.97,3808.82 -19.66,3815.13 -18.65,3821.92 -16.99,3828.59 -14.67,3835.06 -11.73,3841.27 -8.2,3847.16 -4.11,3852.67 0.5,3857.76 5.59,3862.38 11.11,3866.47 17,3870 23.21,3872.94 29.68,3875.25 36.34,3876.92 43.14,3877.93 49.45,3878.24 50,3878.19 3808.27,3878.19 3808.82,3878.24
+5VDC on Power (split plane): 325,3854.9 3806.44,3854.9 3810.87,3854.61 3816.65,3853.46 3822.22,3851.57 3827.5,3848.97 3832.39,3845.7 3836.82,3841.82 3840.7,3837.39 3843.97,3832.5 3846.57,3827.22 3848.46,3821.65 3849.61,3815.87 3849.97,3810.36 3849.9,3810 3849.9,360 3849.97,359.64 3849.61,354.13 3848.46,348.35 3846.57,342.78 3843.97,337.5 3840.7,332.61 3836.82,328.18 3832.39,324.3 3827.5,321.03 3822.22,318.43 3816.65,316.54 3810.87,315.39 3806.44,315.1 3610,315.1 3609.92,315.08 3603.83,314.74 3597.74,313.71 3591.81,312 3586.1,309.63 3580.69,306.64 3575.65,303.07 3571.05,298.95 3566.93,294.35 3563.36,289.31 3560.37,283.9 3558,278.19 3556.29,272.26 3555.26,266.17 3554.92,260.08 3554.9,260 3554.9,55 3554.97,54.64 3554.61,49.13 3553.46,43.35 3551.57,37.78 3548.97,32.5 3545.7,27.61 3541.82,23.18 3537.39,19.3 3532.5,16.03 3527.22,13.43 3521.65,11.54 3515.87,10.39 3510.36,10.03 3510,10.1 70,10.1 69.64,10.03 64.13,10.39 58.35,11.54 52.78,13.43 47.5,16.03 42.61,19.3 38.18,23.18 34.3,27.61 31.03,32.5 28.43,37.78 26.54,43.35 25.39,49.13 25.03,54.64 25.1,55 25.1,3395 25.03,3395.36 25.39,3400.87 26.54,3406.65 28.43,3412.22 31.03,3417.5 34.3,3422.39 38.18,3426.82 42.61,3430.7 47.5,3433.97 52.78,3436.57 58.35,3438.46 64.13,3439.61 69.64,3439.97 70,3439.9 225,3439.9 225.08,3439.92 231.17,3440.26 237.26,3441.29 243.19,3443 248.9,3445.37 254.31,3448.36 259.35,3451.93 263.95,3456.05 268.07,3460.65 271.64,3465.69 274.63,3471.1 277,3476.81 278.71,3482.74 279.74,3488.83 280.08,3494.92 280.1,3495 280.1,3790 280.1,3810 280.03,3810.36 280.39,3815.87 281.54,3821.65 283.43,3827.22 286.03,3832.5 289.3,3837.39 293.18,3841.82 297.61,3845.7 302.5,3848.97 307.78,3851.57 313.35,3853.46 319.13,3854.61 324.64,3854.97
+3V3DC on Power (split plane): 395 vertices, not listed, extent 230.03,2045.03 3799.97,3269.97
+Vbat on Power (split plane): 1070.87,3639.61 1076.65,3638.46 1082.22,3636.57 1087.5,3633.97 1092.39,3630.7 1096.82,3626.82 1100.7,3622.39 1103.97,3617.5 1106.57,3612.22 1108.46,3606.65 1109.61,3600.87 1109.97,3595.36 1109.9,3595 1109.9,3430 1109.97,3429.64 1109.61,3424.13 1108.46,3418.35 1106.57,3412.78 1103.97,3407.5 1100.7,3402.61 1096.82,3398.18 1092.39,3394.3 1087.5,3391.03 1082.22,3388.43 1076.65,3386.54 1070.87,3385.39 1065.36,3385.03 1065,3385.1 400,3385.1 399.64,3385.03 394.13,3385.39 388.35,3386.54 382.78,3388.43 377.5,3391.03 372.61,3394.3 368.18,3398.18 364.3,3402.61 361.03,3407.5 358.43,3412.78 356.54,3418.35 355.39,3424.13 355.03,3429.64 355.1,3430 355.1,3595 355.03,3595.36 355.39,3600.87 356.54,3606.65 358.43,3612.22 361.03,3617.5 364.3,3622.39 368.18,3626.82 372.61,3630.7 377.5,3633.97 382.78,3636.57 388.35,3638.46 394.13,3639.61 399.64,3639.97 400,3639.9 1065,3639.9 1065.36,3639.97
GND on Ground (split plane): 3815.13,3877.93 3821.92,3876.92 3828.59,3875.25 3835.06,3872.94 3841.27,3870 3847.16,3866.47 3852.67,3862.38 3857.76,3857.76 3862.38,3852.67 3866.47,3847.16 3870,3841.27 3872.94,3835.06 3875.25,3828.59 3876.92,3821.92 3877.93,3815.13 3878.24,3808.82 3878.19,3808.27 3878.19,50 3878.24,49.45 3877.93,43.14 3876.92,36.34 3875.25,29.68 3872.94,23.21 3870,17 3866.47,11.11 3862.38,5.59 3857.76,0.5 3852.67,-4.11 3847.16,-8.2 3841.27,-11.73 3835.06,-14.67 3828.59,-16.99 3821.92,-18.65 3815.13,-19.66 3808.82,-19.97 3808.27,-19.92 50,-19.92 49.45,-19.97 43.14,-19.66 36.34,-18.65 29.68,-16.99 23.21,-14.67 17,-11.73 11.11,-8.2 5.59,-4.11 0.5,0.5 -4.11,5.59 -8.2,11.11 -11.73,17 -14.67,23.21 -16.99,29.68 -18.65,36.34 -19.66,43.14 -19.97,49.45 -19.92,50 -19.92,3808.27 -19.97,3808.82 -19.66,3815.13 -18.65,3821.92 -16.99,3828.59 -14.67,3835.06 -11.73,3841.27 -8.2,3847.16 -4.11,3852.67 0.5,3857.76 5.59,3862.38 11.11,3866.47 17,3870 23.21,3872.94 29.68,3875.25 36.34,3876.92 43.14,3877.93 49.45,3878.24 50,3878.19 3808.27,3878.19 3808.82,3878.24
GND on Ground (split plane): 3770.87,3814.61 3776.65,3813.46 3782.22,3811.57 3787.5,3808.97 3792.39,3805.7 3796.82,3801.82 3800.7,3797.39 3803.97,3792.5 3806.57,3787.22 3808.46,3781.65 3809.61,3775.87 3809.97,3770.36 3809.9,3770 3809.9,315.1 3590,315.1 3589.92,315.08 3583.83,314.74 3577.74,313.71 3571.81,312 3566.1,309.63 3560.69,306.64 3555.65,303.07 3551.05,298.95 3546.93,294.35 3543.36,289.31 3540.37,283.9 3538,278.19 3536.29,272.26 3535.26,266.17 3534.92,260.08 3534.9,260 3534.9,85 3534.97,84.64 3534.61,79.13 3533.46,73.35 3531.57,67.78 3528.97,62.5 3525.7,57.61 3521.82,53.18 3517.39,49.3 3512.5,46.03 3507.22,43.43 3501.65,41.54 3495.87,40.39 3490.36,40.03 3490,40.1 95,40.1 94.64,40.03 89.13,40.39 83.35,41.54 77.78,43.43 72.5,46.03 67.61,49.3 63.18,53.18 59.3,57.61 56.03,62.5 53.43,67.78 51.54,73.35 50.39,79.13 50.03,84.64 50.1,85 50.1,3460 50.04,3460.28 50.32,3464.57 51.22,3469.05 52.69,3473.38 54.71,3477.49 57.25,3481.29 60.27,3484.73 63.71,3487.75 67.51,3490.29 71.62,3492.31 75.95,3493.78 80.43,3494.68 84.72,3494.96 85,3494.9 250,3494.9 250.08,3494.92 256.17,3495.26 262.26,3496.29 268.19,3498 273.9,3500.37 279.31,3503.36 284.35,3506.93 288.95,3511.05 293.07,3515.65 296.64,3520.69 299.63,3526.1 302,3531.81 303.71,3537.74 304.74,3543.83 305.08,3549.92 305.1,3550 305.1,3795 305.03,3795.32 305.39,3798.9 306.53,3802.65 308.37,3806.11 310.86,3809.14 313.89,3811.63 317.35,3813.47 321.1,3814.61 324.68,3814.97 325,3814.9 3765,3814.9 3765.36,3814.97

## Other copper
Signal_1:
  region net GND: 940,2960 840,2960 695,2815 695,2720 722.5,2692.5 940,2910
  region net +5VDC: 420,3055 790,3055 790,2935 730,2875 675,2875 635,2915 445,2915 395,2965 395,3030
  region net GND: 420,3123.58 820,3123.58 820,3303.58 795,3328.58 700,3328.58 625,3253.58 435,3253.58 395,3213.58 395,3148.58
  region net GND: 2180,3685 1405,3685 1385,3705 1385,3785 1400,3800 2185,3800 2200,3785 2200,3705
  region net GND: 1545,3230 1470,3305 1325,3305 1250,3230 1250,3165 1295,3120 1490,3120 1545,3175
  region net +3V3DC: 1250,2960 1315,2895 1480,2895 1545,2960 1545,3025 1500,3070 1305,3070 1250,3015
  region net +3V3DC: 865,3270 840,3245 840,3015 870,2985 965,2985 975,2975 975,2920 995,2900 1035,2900 1055,2920 1055,2975 1070,2990 1155,2990 1190,3025 1190,3230 1150,3270
  region net C0_ANALOG: 1675,3435 1625,3385 1725,3385
  region net C0_ANALOG: 1455,3435 1405,3385 1505,3385
Power (plane layer: these items are gaps in the copper):
  lines w10: 350,3512.5 350,3595 ; 405,3645 1065,3645 cw(c1065,3595) 1115,3595 1115,3430 cw(c1065,3430) 1065,3380 400,3380 cw(c400,3430) 350,3430 350,3595 ; 450,3645 400,3645 ; 625,2510 740,2510 ccw(c740,2560) 790,2560 790,2870 ccw(c790,2920) 840,2920 840,3010 840,3225 cw(c890,3225) 890,3275 1170,3275 cw(c1170,3225) 1220,3225 1220,3150 ccw(c1270,3150) 1270,3100 1490,3100 cw(c1490,3050) 1540,3050 1540,3000 ccw(c1590,3000) 1590,2950 2715,2950 cw(c2715,2900) 2765,2900 2765,2235 ccw(c2815,2235) 2815,2185 3530,2185 ccw(c3530,2235) 3580,2235 3580,2340 cw(c3630,2340) 3630,2390 3765,2390 cw(c3765,2350) 3805,2350 3805,2090 cw(c3755,2090) 3755,2040 2700,2040 cw(c2700,2090) 2650,2090 2650,2590 ccw(c2600,2590) 2600,2640 1750,2640 ccw(c1750,2595) 1705,2595 cw(c1655,2595) 1655,2545 1390,2545 cw(c1390,2595) 1340,2595 1340,2895 ccw(c1290,2895) 1290,2945 1150,2945 ccw(c1150,2895) 1100,2895 1100,2840 cw(c1050,2840) 1050,2790 960,2790 ccw(c960,2740) 910,2740 910,2355 cw(c875,2355) 875,2320 275,2320 cw(c275,2370) 225,2370 225,2460 cw(c275,2460) 275,2510 640,2510 ; 3805,310 ccw(c3805,360) 3855,360 3855,3810 ccw(c3805,3810) 3805,3860 ; 3820,310 3730,310 3610,310 ccw(c3610,260) 3560,260 3560,55 cw(c3510,55) 3510,5 70,5 cw(c70,55) 20,55 20,3395 cw(c70,3395) 70,3445 225,3445 ccw(c225,3495) 275,3495 275,3790 275,3810 cw(c325,3810) 325,3860 3730,3860 3825,3860 ; 350,3595 cw(c400,3595) 400,3645 ; 350,3595 cw(c400,3595) 400,3645
Ground (plane layer: these items are gaps in the copper):
  lines w10: 45,85 ccw(c95,85) 95,35 3490,35 ccw(c3490,85) 3540,85 3540,260 cw(c3590,260) 3590,310 3810,310 cw(c3810,305) 3815,305 3815,3770 ccw(c3765,3770) 3765,3820 325,3820 ccw(c325,3795) 300,3795 300,3550 cw(c250,3550) 250,3500 85,3500 ccw(c85,3460) 45,3460 45,85

## Silkscreen, mask and mechanical layers (free items; w line width, h text height)
Top Overlay:
  lines w10: 45,2725 200,2725 ; 55,2515 205,2515 ; 115,298.38 115,351.62 ; 204.83,661.77 204.83,715 ; 265.16,298.38 265.16,351.62 ; 308.97,664.88 308.97,718.11 ; 415.16,298.38 415.16,351.62 ; 525,298.38 525,351.62 ; 635,298.38 635,351.62 ; 650,1595 755,1595 ; 650,1700 755,1700 ; 2740,293.38 2740,346.62 ; 2890.16,293.38 2890.16,346.62 ; 3040.16,293.38 3040.16,346.62 ; 3150,293.38 3150,346.62 ; 3260,293.38 3260,346.62
  text "+5V" at 66,2801 h40
  text "-" at 2648.86,2626.01 h40
  text "GND" at 76,2601 h40
  text "+3V3" at 46,2391 h40
  text "+" at 2648.86,2309.34 h40
  text "+" at 2656,2069.34 h40
  text "B7" at 3391,2011 h40
  text "BOS_GPIO/ANALOG" at 51,1927.66 h40
  text "A1" at 656,1726 h40
  text "-" at 16,1716.01 h40
  text "A2" at 656,1626 h40
  text "+" at 16,1614.34 h40
  text "-" at 3831,1566.01 h40
  text "A3" at 656,1526 h40
  text "S" at 16,1501 h40
  text "+" at 3831,1464.34 h40
  text "SERVO1" at 91,1366 h40
  text "S" at 3828.86,1363.48 h40
  text "BOS_PWM" at 372.03,1357.36 h40
  text "BOS_UART" at 101,1287.66 h40
  text "S" at 3828.86,1143.48 h40
  text "-" at 26,1126.01 h40
  text "-" at 3826,1046.01 h40
  text "TX" at 6,1031 h40
  text "RX" at 11,936 h40
  text "+" at 26,829.34 h40
  text "S" at 3823.86,813.48 h40
  text "-" at 164,708.99 h40 r180
  text "S" at 374,709 h40 r180
  text "-" at 3826,706.01 h40
  text "+" at 270.66,676 h40 r90
  text "ESC1" at 431,586 h40
  text "S" at 3828.86,483.48 h40
  text "ESC2" at 426,466 h40
  text "-" at 3831,376.01 h40
  text "-" at 94,343.99 h40 r180
  text "-" at 2719,338.99 h40 r180
  text "SCL" at 136,309.38 h40
  text "SDA" at 286,309.38 h40
  text "TX" at 436,309.38 h40
  text "RX" at 546,309.38 h40
  text "+" at 690.66,309.38 h40 r90
  text "SCL" at 2761,304.38 h40
  text "SDA" at 2911,304.38 h40
  text "TX" at 3061,304.38 h40
  text "RX" at 3171,304.38 h40
  text "+" at 3315.66,304.38 h40 r90
  text "GPS1" at 766,151 h40
Drill Drawing:
  lines w80: 0,2637.8 0,3808.27 cw(c50,3808.27) 50,3858.27 3808.27,3858.27 cw(c3808.27,3808.27) 3858.27,3808.27 3858.27,50 cw(c3808.27,50) 3808.27,0 50,0 cw(c50,50) 0,50 0,2795.28

## Text inside footprints (layer, text, board x,y; h text height)
CARD1: Top Overlay "USB" at 1951.81,118.07 h100